# Altium PCB PCB_GEMAS_V2(RevisaEsta).PcbDoc
Units mm, origin at the board's own origin, x right, y up, seen from the top; angles counter-clockwise.
Board outline 100 x 72 mm, 2 copper layers (Top Layer, Bottom Layer); 89 components, 61 nets, 762 pads, 121 vias.
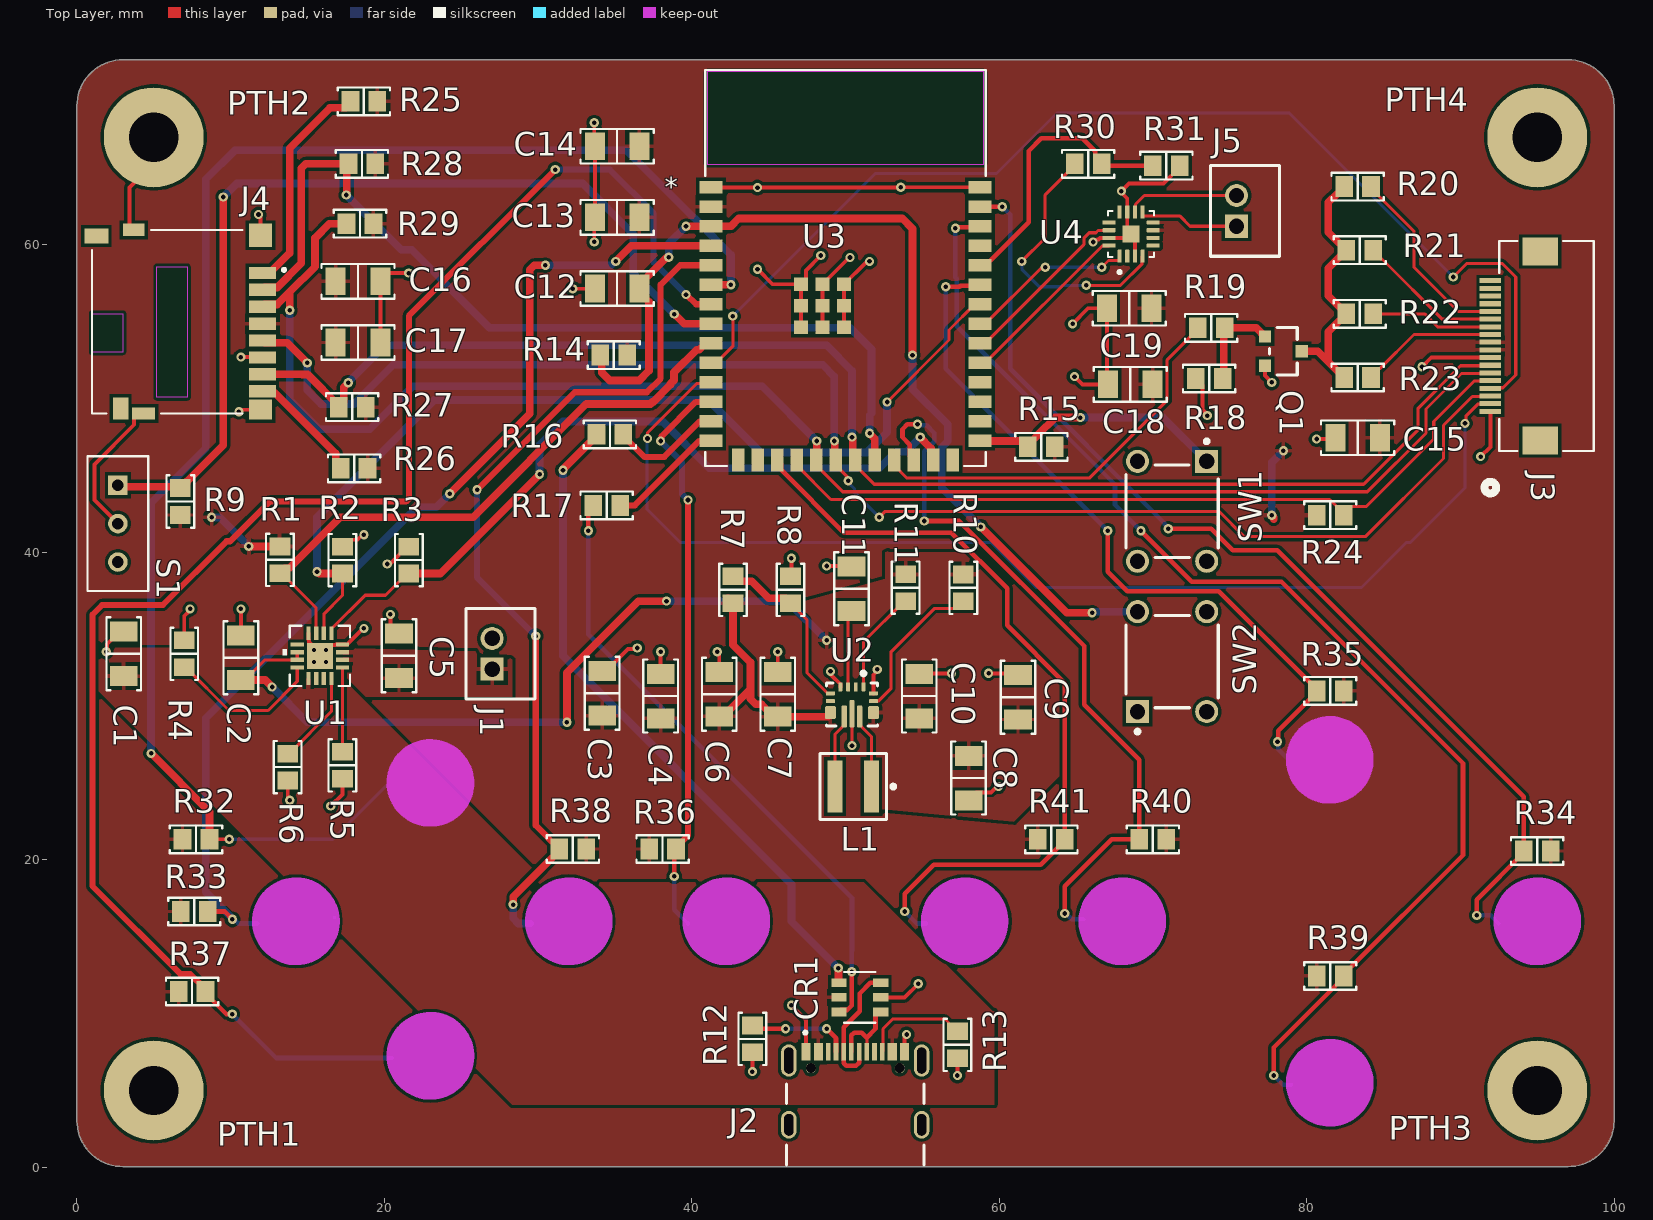
[diagram p0: Top Layer view]
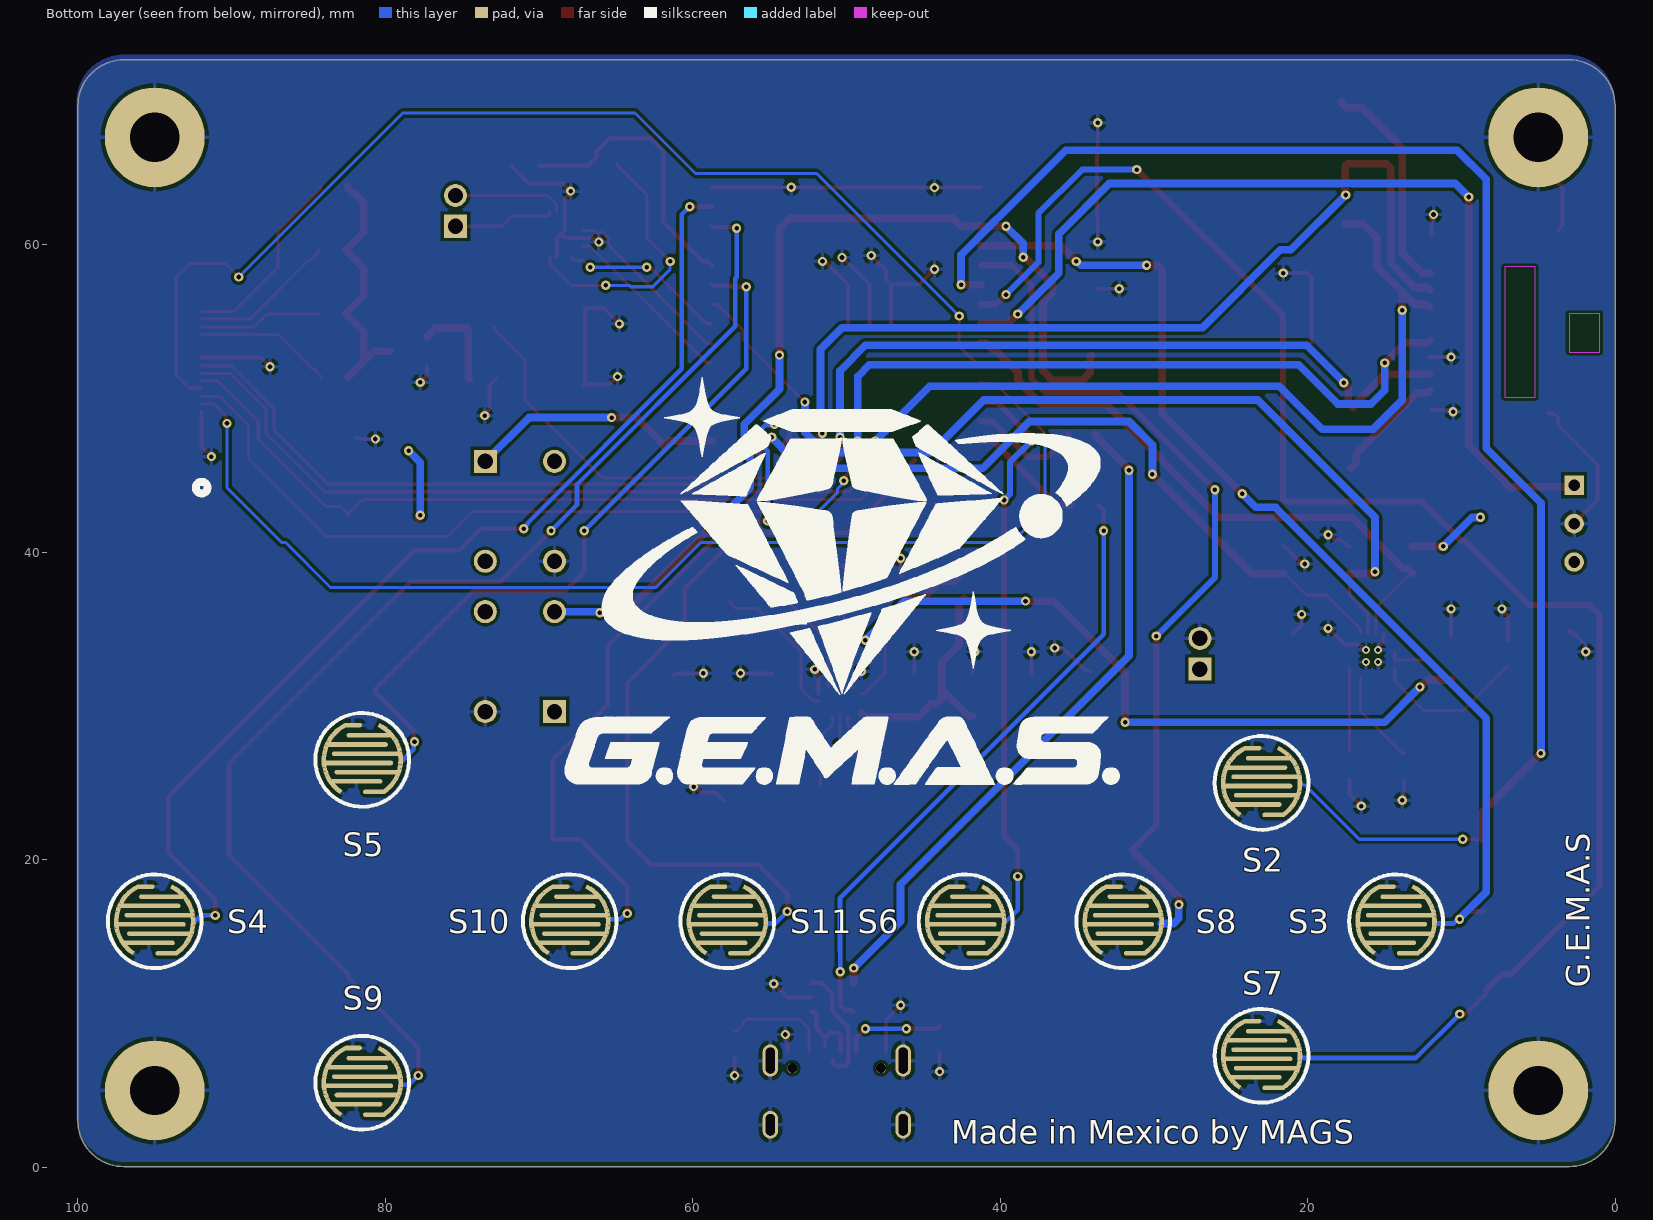
[diagram p1: Bottom Layer view, seen from below]
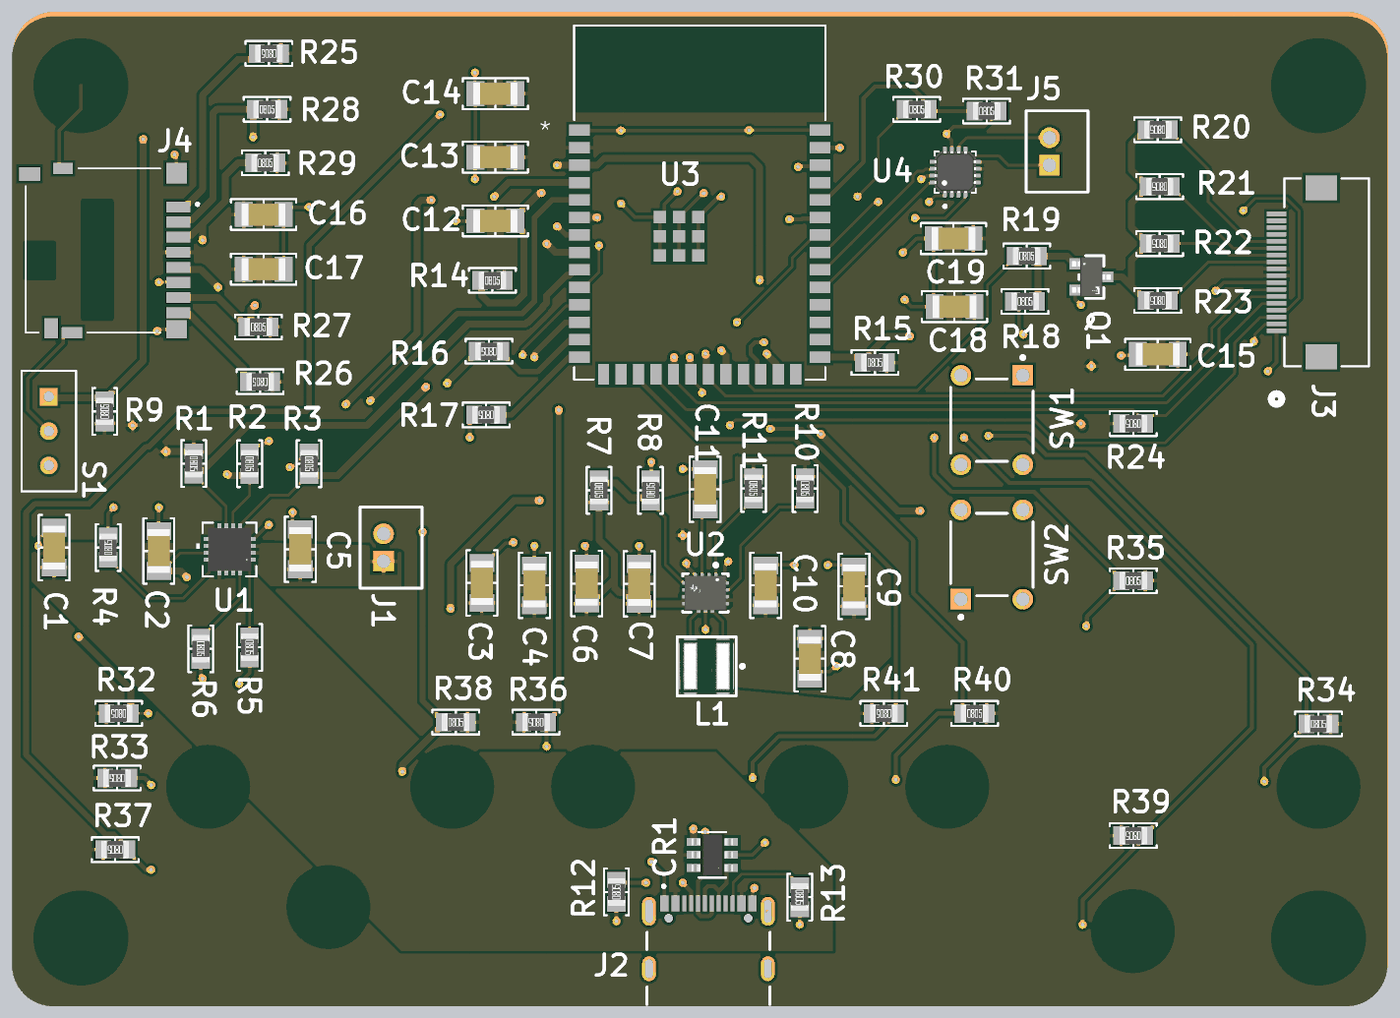
[diagram p2: 3D render of the assembled board from above, using the file's embedded part models]

## Layer stack, top to bottom
Top Solder: solder mask 0.0102, Solder Resist, Dk 3.5
Top Layer: signal copper 0.0356
Dielectric 1: dielectric 0.32, FR-4, Dk 4.8
Bottom Layer: signal copper 0.0356
Bottom Solder: solder mask 0.0102, Solder Resist, Dk 3.5

## Board outline
0,3.041 0,69.041 cw(c3,69.041) 3,72.041 97,72.041 cw(c97,69.041) 100,69.041 100,3.041 cw(c97,3.041) 97,0.041 3,0.041 cw(c3,3.041)

## Design rules (kind name [scope] priority, off if disabled: settings)
Clearance CLEARANCE_U1_VBAT_ESCAPE_LOCAL [IsTrack And InNet('VBAT') And InRegionRelative(670,1290,707,1335) vs IsPad And InComponent('U1')] p1: gap=0.2 ignorepadtopadclearanceinfootprint=FALSE
Clearance CLEARANCE_J4_PAD8_S1 [HasPad('J4-8') vs HasPad('J4-S1')] p2: gap=0.14 ignorepadtopadclearanceinfootprint=FALSE
Clearance CLEARANCE_J4_MECHANICAL [HasPad('J4-S3') vs HasPad('J4-SW-B')] p3: gap=0.24 ignorepadtopadclearanceinfootprint=FALSE
Clearance CLEARANCE_J2_NPTH_TO_SMD [IsPad And InComponent('J2') And (Hole = 0.65) vs IsPad And InComponent('J2') And (Hole = 0)] p4: gap=0.17 ignorepadtopadclearanceinfootprint=FALSE
Clearance Clearance_1CLEARANCE_J4_SIGNAL_PADS [HasPad('J4-1') Or HasPad('J4-2') Or HasPad('J4-3') Or HasPad('J4-4') Or HasPad('J4-5') Or HasPad('J4-6') Or HasPad('J4-7') Or HasPad('J4-8') vs HasPad('J4-1') Or HasPad('J4-2') Or HasPad('J4-3') Or HasPad('J4-4') Or HasPad('J4-5') Or HasPad('J4-6') Or HasPad('J4-7') Or HasPad('J4-8')] p5: gap=0.29 ignorepadtopadclearanceinfootprint=FALSE
Clearance CLEARANCE_U2_PADPAD [IsPad And InComponent('U2') vs IsPad And InComponent('U2')] p6: gap=0.15 ignorepadtopadclearanceinfootprint=FALSE
Clearance CLEARANCE_J2_SMD [IsPad And InComponent('J2') And (Hole = 0) vs IsPad And InComponent('J2') And (Hole = 0)] p7: gap=0.19 ignorepadtopadclearanceinfootprint=FALSE
Clearance CLEARANCE_CR1_PADPAD [IsPad And InComponent('CR1') vs IsPad And InComponent('CR1')] p8: gap=0.39 ignorepadtopadclearanceinfootprint=FALSE
Clearance CLEARANCE_J3_PADPAD [IsPad And InComponent('J3') vs IsPad And InComponent('J3')] p9: gap=0.16 ignorepadtopadclearanceinfootprint=FALSE
Clearance CLEARANCE_U4_PADPAD [IsPad And InComponent('U4') vs IsPad And InComponent('U4')] p10: gap=0.2 ignorepadtopadclearanceinfootprint=FALSE
Clearance CLEARANCE_U1_PADPAD [IsPad And InComponent('U1') vs IsPad And InComponent('U1')] p11: gap=0.19 ignorepadtopadclearanceinfootprint=FALSE
Clearance CLEARANCE_BUTTON_S2_PADPAD [IsPad And InComponent('S2') vs IsPad And InComponent('S2')] p12: gap=0.29 ignorepadtopadclearanceinfootprint=FALSE
Clearance CLEARANCE_BUTTON_S3_PADPAD [IsPad And InComponent('S3') vs IsPad And InComponent('S3')] p13: gap=0.29 ignorepadtopadclearanceinfootprint=FALSE
Clearance CLEARANCE_BUTTON_S4_PADPAD [IsPad And InComponent('S4') vs IsPad And InComponent('S4')] p14: gap=0.29 ignorepadtopadclearanceinfootprint=FALSE
Clearance CLEARANCE_BUTTON_S5_PADPAD [IsPad And InComponent('S5') vs IsPad And InComponent('S5')] p15: gap=0.29 ignorepadtopadclearanceinfootprint=FALSE
Clearance CLEARANCE_BUTTON_S6_PADPAD [IsPad And InComponent('S6') vs IsPad And InComponent('S6')] p16: gap=0.29 ignorepadtopadclearanceinfootprint=FALSE
Clearance CLEARANCE_BUTTON_S7_PADPAD [IsPad And InComponent('S7') vs IsPad And InComponent('S7')] p17: gap=0.29 ignorepadtopadclearanceinfootprint=FALSE
Clearance CLEARANCE_BUTTON_S8_PADPAD [IsPad And InComponent('S8') vs IsPad And InComponent('S8')] p18: gap=0.29 ignorepadtopadclearanceinfootprint=FALSE
Clearance CLEARANCE_BUTTON_S9_PADPAD [IsPad And InComponent('S9') vs IsPad And InComponent('S9')] p19: gap=0.29 ignorepadtopadclearanceinfootprint=FALSE
Clearance CLEARANCE_BUTTON_S10_PADPAD [IsPad And InComponent('S10') vs IsPad And InComponent('S10')] p20: gap=0.29 ignorepadtopadclearanceinfootprint=FALSE
Clearance CLEARANCE_BUTTON_S11_PADPAD [IsPad And InComponent('S11') vs IsPad And InComponent('S11')] p21: gap=0.29 ignorepadtopadclearanceinfootprint=FALSE
Clearance [All] p22: gap=0.2 ignorepadtopadclearanceinfootprint=FALSE
HoleSize HOLE_SIZE_M3_MOUNTING [HasPad('PTH1-1') Or HasPad('PTH2-1') Or HasPad('PTH3-1') Or HasPad('PTH4-1')] p1: absolutevalues=TRUE maxlimit=3.3 minlimit=0.025 maxpercent=80.000 minpercent=20.000
HoleSize [All] p2: absolutevalues=TRUE maxlimit=2.54 minlimit=0.025 maxpercent=80.000 minpercent=20.000
MinimumSolderMaskSliver [All] p1: minsoldermaskwidth=0.1
PolygonConnect [All] p1: connectstyle=Relief reliefconductorwidth=0.254 reliefentries=4 polygonreliefangle="90 Angle" airgapwidth=0.254
RoutingVias [All] p1: holewidth=0.3 width=0.6 viastyle="Through Hole" minholewidth=0.3 minwidth=0.6 maxholewidth=0.3 maxwidth=0.6
SilkToSolderMaskClearance [IsPad] p1: minsilkscreentomaskgap=0.15 clearancetoexposedcopper=TRUE
SolderMaskExpansion MASK_EXPANSION_BUTTON_S2 [IsPad And InComponent('S2')] p1: expansion=0.05 istentingtop=FALSE
SolderMaskExpansion MASK_EXPANSION_J4_LOCAL [HasPad('J4-8') Or HasPad('J4-S1')] p2: expansion=0.02 istentingtop=FALSE
SolderMaskExpansion MASK_EXPANSION_J2 [IsPad And InComponent('J2') And ((Hole = 0) Or (Hole = 0.65))] p3: expansion=0.03 istentingtop=FALSE
SolderMaskExpansion [All] p4: expansion=0.05 istentingtop=FALSE
SupplyNets "Schematic Supply Nets_4" [InNet('+3V3')] p1: voltage=0.000
SupplyNets "Schematic Supply Nets_3" [InNet('GND')] p2: voltage=0.000
SupplyNets "Schematic Supply Nets_2" [InNet('VBAT')] p3: voltage=0.000
SupplyNets "Schematic Supply Nets_1" [InNet('VSYS')] p4: voltage=0.000
SupplyNets "Schematic Supply Nets" [InNet('VBUS_V5')] p5: voltage=0.000
Width W_U1_VBAT_ESCAPE_LOCAL [IsTrack And InNet('VBAT') And InRegionRelative(670,1290,707,1335)] p1: maxlimit=1.5 minlimit=0.2 preferedwidth=0.4
Width W_BACKLIGHT [InNetClass('BACKLIGHT')] p2: maxlimit=0.5 minlimit=0.2 preferedwidth=0.5
Width W_SPEAKER [InNetClass('SPEAKER')] p3: maxlimit=0.8 minlimit=0.2 preferedwidth=0.5
Width W_POWER [InNetClass('POWER') Or InNetClass('REG_SW')] p4: maxlimit=1.5 minlimit=0.2 preferedwidth=0.8
Width [All] p5: maxlimit=1.5 minlimit=0.2 preferedwidth=0.4
27 further rules are at their usual default settings.

## Classes and differential pairs
net class CONTROL: NetC12_2 NetJ3_2 NetJ3_4 NetJ4_1 NetJ4_8 NetQ1_1 NetR2_2 NetR3_2 NetR9_2 NetR10_2 NetR11_2 NetR15_1 NetR19_1 NetR30_1 NetR30_2 NetR32_1 NetR33_1 NetR34_1 NetR35_1 NetR36_1 NetR37_1 NetR38_1 NetR39_1 NetR40_1 NetR41_1 USB_POWER_GOOD_N
net class POWER_ANALOG: NetC11_2 NetR4_1 NetR5_1 NetR6_1 NetR7_1
net class I2S: NetU3_31 NetU3_32 NetU3_33
net class SPI: NetJ3_5 NetJ4_2 SPI_MISO SPI_MOSI SPI_SCK
net class USB_CC: NetJ2_A5 NetJ2_B5
net class USB_DATA: NetCR1_1 NetCR1_3 NetCR1_4 NetCR1_6 NetR16_1 NetR17_1
net class BACKLIGHT: NetJ3_11 NetJ3_12 NetJ3_13 NetJ3_14 NetQ1_3
net class SPEAKER: NetJ5_1 NetJ5_2
net class REG_SW: NetL1_1 NetL1_2
net class GND: GND
net class POWER: +3V3 VBAT VBUS_V5 VSYS
component class USB-C: CR1 J2 R12 R13
component class Pantalla_microSD: C15 C16 C17 J3 J4 Q1 R18 R19 R20 R21 R22 R23 R24 R25 R26 R27 R28 R29
component class ESP32: C12 C13 C14 R14 R15 R16 R17 SW1 SW2 U3
component class Controles: PTH1 PTH2 PTH3 PTH4 R32 R33 R34 R35 R36 R37 R38 R39 R40 R41 S2 S3 S4 S5 S6 S7 S8 S9 S10 S11
component class Audio: C18 C19 J5 R30 R31 U4
component class Alimentacion: C1 C2 C3 C4 C5 C6 C7 C8 C9 C10 C11 J1 L1 R1 R2 R3 R4 R5 R6 R7 R8 R9 R10 R11 S1 U1 U2

## Components (designator, comment, footprint, x,y, rotation, side; value= is the part's Value field where it differs from the comment)
C1 "Capacitor" "CAP 1206_3216" 3.048,33.401 r90 top value=1uF
C2 "Capacitor" "CAP 1206_3216" 10.668,33.147 r270 top value=10uF
C3 "22uF" "CAP 1206_3216" 34.168,30.832 r90 top
C4 "22uF" "CAP 1206_3216" 37.977,30.652 r90 top
C5 "Capacitor" "CAP 1206_3216" 20.955,33.274 r270 top value=10uF
C6 "22uF" "CAP 1206_3216" 41.786,30.779 r90 top
C7 "Capacitor" "CAP 1206_3216" 45.595,30.762 r90 top value=10uF
C8 "Capacitor" "CAP 1206_3216" 58.007,25.318 r90 top value=10uF
C9 "Capacitor" "CAP 1206_3216" 61.219,30.578 r270 top value=10uF
C10 "Capacitor" "CAP 1206_3216" 54.794,30.652 r270 top value=10uF
C11 "Capacitor" "CAP 1206_3216" 50.395,37.638 r270 top value=100nF
C12 "1 uF" "CAP 1206_3216" 35.141,57.164 r0 top
C13 "Capacitor" "CAP 1206_3216" 35.141,61.792 r0 top value=22uF
C14 "Capacitor" "CAP 1206_3216" 35.141,66.421 r180 top value=100nF
C15 "Capacitor" "CAP 1206_3216" 83.312,47.459 r0 top value=100nF
C16 "Capacitor" "CAP 1206_3216" 18.288,57.629 r180 top value=100nF
C17 "Capacitor" "CAP 1206_3216" 18.288,53.65 r180 top value=10uF
C18 "Capacitor" "CAP 1206_3216" 68.527,50.927 r0 top value=10uF
C19 "Capacitor" "CAP 1206_3216" 68.453,55.88 r0 top value=100nF
CR1 "USBLC6-2SC6" SOT23-6L_STM 50.927,11.049 r180 top
J1 "B2B-PH-K-S(LF)(SN)" JST-B2B-PH-K-S_V 27.559,33.401 r90 top
J2 "USB4105-GF-A" GCT_USB4105-GF-A 50.635,2.762 r0 top
J3 "FH12-18S-0.5SH(55)" CONN_FH12-18S-0.5SH-55_HIR 91.948,49.173 r90 top
J4 "DM3D-SF" HRS_DM3D-SF 12.07,54.979 r90 top
J5 "B2B-PH-K-S(LF)(SN)" JST-B2B-PH-K-S_V 75.988,62.214 r90 top
L1 "1.5uH" FP-XFL4020-MFG 50.504,24.765 r180 top
PTH1 "MH_M3" PCBComponent_1#1 -53.217,211.535 r0 top
PTH2 "MH_M3" PCBComponent_1#2 54.61,212.344 r0 top
PTH3 "MH_M3" PCBComponent_1#3 46.736,212.344 r0 top
PTH4 "MH_M3" PCBComponent_1#4 28.571,279.48 r0 top
Q1 "AO3400A" FP-SOT23-MFG 78.486,53.086 r0 top
R1 "Resistor" "RES 0805_2012" 13.208,39.511 r270 top value="10 k"
R2 "Resistor" "RES 0805_2012" 17.272,39.497 r270 top value="10 k"
R3 "Resistor" "RES 0805_2012" 21.59,39.497 r270 top value="10 k"
R4 "Resistor" "RES 0805_2012" 6.985,33.401 r90 top value="3.48 k"
R5 "Resistor" "RES 0805_2012" 17.272,26.148 r270 top value="10 k"
R6 "Resistor" "RES 0805_2012" 13.716,26.035 r270 top value="1.78 k"
R7 "Resistor" "RES 0805_2012" 42.677,37.563 r270 top value="470 k"
R8 "Resistor" "RES 0805_2012" 46.423,37.563 r90 top value="150 k"
R9 "Resistor" "RES 0805_2012" 6.731,43.307 r90 top value=10k
R10 "Resistor" "RES 0805_2012" 57.663,37.69 r270 top value=10k
R11 "Resistor" "RES 0805_2012" 53.917,37.704 r270 top value=10k
R12 "Resistor" "RES 0805_2012" 43.942,8.349 r90 top value="5.1 k"
R13 "Resistor" "RES 0805_2012" 57.277,7.968 r270 top value="5.1 k"
R14 "10 k" "RES 0805_2012" 34.925,52.832 r0 top value="10 K"
R15 "10 k" "RES 0805_2012" 62.738,46.863 r0 top value="10 K"
R16 "Resistor" "RES 0805_2012" 34.677,47.682 r180 top value=22
R17 "Resistor" "RES 0805_2012" 34.466,43.053 r180 top value=22
R18 "Resistor" "RES 0805_2012" 73.66,51.308 r0 top value="100 k"
R19 "Resistor" "RES 0805_2012" 73.787,54.61 r0 top value=100
R20 "Resistor" "RES 0805_2012" 83.312,63.795 r180 top value="1 k"
R21 "Resistor" "RES 0805_2012" 83.453,59.655 r180 top value="1 k"
R22 "Resistor" "RES 0805_2012" 83.453,55.514 r180 top value="1 k"
R23 "Resistor" "RES 0805_2012" 83.312,51.374 r180 top value="1 k"
R24 "Resistor" "RES 0805_2012" 81.534,42.418 r180 top value="10 k"
R25 "Resistor" "RES 0805_2012" 18.669,69.342 r180 top value="10 k"
R26 "Resistor" "RES 0805_2012" 18.034,45.466 r180 top value="10 k"
R27 "Resistor" "RES 0805_2012" 17.907,49.445 r0 top value="10 k"
R28 "Resistor" "RES 0805_2012" 18.542,65.278 r0 top value="10 k"
R29 "Resistor" "RES 0805_2012" 18.415,61.383 r0 top value="10 k"
R30 "Resistor" "RES 0805_2012" 65.786,65.278 r0 top value="634 K"
R31 "Resistor" "RES 0805_2012" 70.866,65.151 r0 top value=10k
R32 "Resistor" "RES 0805_2012" 7.747,21.336 r180 top value="10 k"
R33 "Resistor" "RES 0805_2012" 7.634,16.637 r180 top value="10 k"
R34 "Resistor" "RES 0805_2012" 94.996,20.574 r0 top value="10 k"
R35 "Resistor" "RES 0805_2012" 81.534,30.988 r0 top value="10 k"
R36 "Resistor" "RES 0805_2012" 38.1,20.701 r180 top value="10 k"
R37 "Resistor" "RES 0805_2012" 7.493,11.43 r180 top value="10 k"
R38 "Resistor" "RES 0805_2012" 32.258,20.701 r0 top value="10 k"
R39 "Resistor" "RES 0805_2012" 81.534,12.446 r180 top value="10 k"
R40 "Resistor" "RES 0805_2012" 69.991,21.336 r0 top value="10 k"
R41 "Resistor" "RES 0805_2012" 63.387,21.336 r180 top value="10 k"
S1 "Single-Pole, Double-Throw Switch" 1P2T_SS-12D00_CNK 2.667,44.37 r0 top
S2 "Single-Pole, Single-Throw Switch" SNES_BTN_soft+mech_5mm_0.3_0.3 23,25 r180 bottom
S3 "Single-Pole, Single-Throw Switch" SNES_BTN_soft+mech_5mm_0.3_0.3 14.25,16 r180 bottom
S4 "Single-Pole, Single-Throw Switch" SNES_BTN_soft+mech_5mm_0.3_0.3 95,16 r180 bottom
S5 "Single-Pole, Single-Throw Switch" SNES_BTN_soft+mech_5mm_0.3_0.3 81.5,26.5 r180 bottom
S6 "Single-Pole, Single-Throw Switch" SNES_BTN_soft+mech_5mm_0.3_0.3 42.25,16 r180 bottom
S7 "Single-Pole, Single-Throw Switch" SNES_BTN_soft+mech_5mm_0.3_0.3 23,7.25 r180 bottom
S8 "Single-Pole, Single-Throw Switch" SNES_BTN_soft+mech_5mm_0.3_0.3 32,16 r180 bottom
S9 "Single-Pole, Single-Throw Switch" SNES_BTN_soft+mech_5mm_0.3_0.3 81.5,5.5 r180 bottom
S10 "Single-Pole, Single-Throw Switch" SNES_BTN_soft+mech_5mm_0.3_0.3 68,16 r180 bottom
S11 "Single-Pole, Single-Throw Switch" SNES_BTN_soft+mech_5mm_0.3_0.3 57.75,16 r180 bottom
SW1 "B3F-1000" OMRON-B3F-1000-4_V 71.247,42.672 r270 top
SW2 "B3F-1000" OMRON-B3F-1000-4_V 71.247,32.893 r90 top
U1 "BQ24074RGTR" RGT16_1P7X1P7 15.812,33.261 r180 top
U2 "TPS63070RNMR" FP-RNM0015A-MFG 50.419,30.099 r270 top
U3 "ESP32-S3-WROOM-1-N16R8" ESP32-S3-WROOM-1_EXP 50,58.5 r0 top
U4 "MAX98357AETE+T" QFN50P300X300X80-17N 68.58,60.706 r90 top

## Footprints (in the part's own frame and the unit in brackets; to place one, negate y for a bottom-side part, rotate by r counter-clockwise, add the part's x,y. Pads: shape width x height; smd on the part's side, far side on the other; paste and mask are expansions set on the pad)
1P2T_SS-12D00_CNK [mil]
  rect 50x50 hole 30 paste-99999 mask+0: 1(0,0)
  round 50 hole 30 paste-99999 mask+0: 2(0,-98.42) 3(0,-196.85)
  silkscreen extent -78,-271 78,74
"CAP 1206_3216" [mm] "Chip Capacitor, 2-Leads, Body 3.25x1.60mm, IPC Medium Density"
  rect 1.3x1.8 smd: 1(-1.45,0) 2(1.45,0)
  silkscreen extent -2.38,-1.13 2.38,1.13, body extent -1.6,-0.81 1.6,0.81, height 1.62
CONN_FH12-18S-0.5SH-55_HIR [mil]
  rect 13x55 smd paste+0 mask+0: 1(0,0) 2(19.68,0) 3(39.37,0) 4(59.05,0) 5(78.74,0) 6(98.42,0) 7(118.11,0) 8(137.79,0) 9(157.48,0) 10(177.17,0) 11(196.85,0) 12(216.54,0) 13(236.22,0) 14(255.91,0) 15(275.59,0) 16(295.28,0) 17(314.96,0) 18(334.65,0)
  rect 71x91 smd paste+0 mask+0: 19(-74.8,-127.95) 20(409.45,-127.95)
  silkscreen extent -210,-264 436,15
ESP32-S3-WROOM-1_EXP [mil]
  rect 59x32 smd paste+0 mask+0: 1(-344.49,207.09) 2(-344.49,157.09) 3(-344.49,107.09) 4(-344.49,57.09) 5(-344.49,7.09) 6(-344.49,-42.91) 7(-344.49,-92.91) 8(-344.49,-142.91) 9(-344.49,-192.91) 10(-344.49,-242.91) 11(-344.49,-292.91) 12(-344.49,-342.91) 13(-344.49,-392.91) 14(-344.49,-442.91) 27(344.49,-442.91) 28(344.49,-392.91) 29(344.49,-342.91) 30(344.49,-292.91) 31(344.49,-242.91) 32(344.49,-192.91) 33(344.49,-142.91) 34(344.49,-92.91) 35(344.49,-42.91) 36(344.49,7.09) 37(344.49,57.09) 38(344.49,107.09) 39(344.49,157.09) 40(344.49,207.09)
  rect 32x59 smd paste+0 mask+0: 15(-275,-492.13) 16(-225,-492.13) 17(-175,-492.13) 18(-125,-492.13) 19(-75,-492.13) 20(-25,-492.13) 21(25,-492.13) 22(75,-492.13) 23(125,-492.13) 24(175,-492.13) 25(225,-492.13) 26(275,-492.13)
  rect 35x35 smd paste+0 mask+0: 41(-59.06,-96.85) 42(-114.17,-41.73) 43(-114.17,-96.85) 44(-114.17,-151.97) 45(-59.06,-151.97) 46(-3.94,-151.97) 47(-3.94,-96.85) 48(-3.94,-41.73) 49(-59.06,-41.73)
  Top Layer keep-out region: 354.5,502 -354.5,502 -354.5,266 354.5,266
  silkscreen extent -359,-507 360,507
FP-RNM0015A-MFG [mm]
  rrect40% 0.6x0.25 smd paste+0 mask-1000: 1(-1.15,0.75) 2(-1.15,0.25) 3(-1.15,-0.25) 4(-1.15,-0.75)
  rrect40% 0.25x0.6 smd paste+0 mask-1000: 5(-0.725,-1.4) 6(-0.225,-1.4) 14(-0.225,1.4) 15(-0.725,1.4)
  rrect29% 0.85x0.7 smd paste-1000 mask-1000: 7-8(0.525,-1.4) 12-13(0.525,1.4)
  rrect57% 1.45x0.35 smd paste-1000 mask-1000: 9(0.775,-0.5) 11(0.775,0.5)
  rrect57% 1.8x0.35 smd paste-1000 mask-1000: 10(0.6,0)
  silkscreen extent -2.15,-1.65 1.4,1.65, body extent -1.25,-1.5 1.25,1.5, height 1
FP-SOT23-MFG [mm]
  rect 0.8x0.8 smd paste+0 mask+0: 1(-1.2,0.95) 2(-1.2,-0.95) 3(1.2,0)
  silkscreen extent -0.9,-1.55 0.9,1.55, body extent -1.41,-1.45 1.41,1.45, height 1.25
FP-XFL4020-MFG [mm]
  rect 0.98x3.4 smd paste+0 mask+0: 1(-1.185,0) 2(1.185,0)
  silkscreen extent -2.73,-2.15 2.15,2.15, body extent -2,-2 2,2, height 2.23
GCT_USB4105-GF-A [mm]
  rect 0.6x1.15 smd: A1_B12(-3.2,4.755) A4_B9(-2.4,4.755) B1_A12(3.2,4.755) B4_A9(2.4,4.755)
  rect 0.3x1.15 smd: A5(-1.25,4.755) A6(-0.25,4.755) A7(0.25,4.755) A8(1.25,4.755) B5(1.75,4.755) B6(0.75,4.755) B7(-0.75,4.755) B8(-1.75,4.755)
  oval 1x2.1 hole 0.6 slot 1.7 at 90 deg: SH1(-4.32,4.18) SH2(4.32,4.18)
  oval 1x1.8 hole 0.6 slot 1.4 at 90 deg: SH3(-4.32,0) SH4(4.32,0)
  round 0.65 hole 0.65 unplated: ""(-2.89,3.68) ""(2.89,3.68)
  silkscreen extent -4.47,-2.6 4.47,6.1
HRS_DM3D-SF [mm]
  rect 0.8x1.75 smd: 1(3.2,0) 2(2.1,0) 3(1,0) 4(-0.1,0) 5(-1.2,0) 6(-2.3,0) 7(-3.4,0) 8(-4.5,0)
  rect 1.3x1.5 smd: S1(-5.7,0.125)
  rect 1.5x1.5 smd: S2(5.65,0.125)
  rect 0.8x1.5 smd: S3(-5.95,7.725)
  rect 0.8x1.4 smd: S4(6,8.375)
  rect 1x1.55 smd: SW-A(5.6,10.8)
  rect 1.45x1 smd: SW-B(-5.625,9.225)
  Keep-Out Layer region: 0.55,9.075 -1.95,9.075 -1.95,11.075 0.55,11.075
  Keep-Out Layer region: 3.6,4.875 -4.9,4.875 -4.9,6.875 3.6,6.875
  Keep-Out Layer region: 3.6,4.875 -4.9,4.875 -4.9,6.875 3.6,6.875
  Keep-Out Layer region: 0.55,9.075 -1.95,9.075 -1.95,11.075 0.55,11.075
  silkscreen extent -5.95,-1.5 6,11.08
JST-B2B-PH-K-S_V [mm] "Connector, 2-Leads, Body 5.9x4.5mm, Pitch 2mm"
  rect 1.5x1.5 hole 1: 1(-1,0.55)
  round 1.5 hole 1: 2(1,0.55)
  silkscreen extent -2.95,-2.25 2.95,2.25, body extent -2.95,-2.25 2.95,2.25, height 6
OMRON-B3F-1000-4_V [mm] "TH, 4-Leads, Body 6x6mm"
  rect 1.5x1.5 hole 1 paste-2539.97: 1(-3.25,2.25)
  round 1.5 hole 1 paste-2539.97: 2(3.25,2.25) 4(3.25,-2.25)
  round 1.5 hole 1 paste-2539.97 mask+0.102: 3(-3.25,-2.25)
  silkscreen extent -4.67,-3 3,3, body extent -3,-3 3,3, height 4.5
PCBComponent_1#1 [mm]
  round 6.5 hole 3.2: 1(58.217,-206.535)
PCBComponent_1#2 [mm]
  round 6.5 hole 3.2: 1(-49.61,-145.344)
PCBComponent_1#3 [mm]
  round 6.5 hole 3.2: 1(48.264,-207.344)
PCBComponent_1#4 [mm]
  round 6.5 hole 3.2: 1(66.429,-212.48)
QFN50P300X300X80-17N [mm]
  rrect25% 0.84x0.27 smd: 1(-1.435,0.75) 2(-1.435,0.25) 3(-1.435,-0.25) 4(-1.435,-0.75) 9(1.435,-0.75) 10(1.435,-0.25) 11(1.435,0.25) 12(1.435,0.75)
  rrect25% 0.27x0.84 smd: 5(-0.75,-1.435) 6(-0.25,-1.435) 7(0.25,-1.435) 8(0.75,-1.435) 13(0.75,1.435) 14(0.25,1.435) 15(-0.25,1.435) 16(-0.75,1.435)
  rect 1.1x1.1 smd paste-0.2: 17(0,0)
  silkscreen extent -2.57,-1.5 1.5,1.5, body extent -1.5,-1.5 1.5,1.5, height 0.9
"RES 0805_2012" [mm] "Chip Resistor, 2-Leads, Body 2.00x1.25mm, IPC Medium Density"
  rect 1.15x1.35 smd: 1(-0.875,0) 2(0.875,0)
  silkscreen extent -1.7,-0.9 1.7,0.9, body extent -1,-0.62 1,0.63, height 0.6
RGT16_1P7X1P7 [mm]
  rect 0.85x0.28 smd paste+0 mask+0: 1(-1.475,0.75) 2(-1.475,0.25) 3(-1.475,-0.25) 4(-1.475,-0.75) 9(1.475,-0.75) 10(1.475,-0.25) 11(1.475,0.25) 12(1.475,0.75)
  rect 0.28x0.85 smd paste+0 mask+0: 5(-0.75,-1.475) 6(-0.25,-1.475) 7(0.25,-1.475) 8(0.75,-1.475) 13(0.75,1.475) 14(0.25,1.475) 15(-0.25,1.475) 16(-0.75,1.475)
  rect 1.7x1.7 smd paste-0.85 mask-0.838: 17(0,0)
  round 0.508 hole 0.254 paste-2539.97 mask-0.254: V(-0.394,0.394) V(-0.394,-0.394) V(0.394,0.394) V(0.394,-0.394)
  silkscreen extent -1.96,-1.96 2.41,1.96, body extent -1.63,-1.63 1.63,1.63, height 1
SNES_BTN_soft+mech_5mm_0.3_0.3 [mm]
  rect 0.3x0.3 smd rot 1.24: 1(-2.499,-0.054)
  rect 0.3x0.3 smd rot 174.75: 1(-2.49,0.229)
  rect 0.3x0.3 smd rot 7.73: 1(-2.477,-0.336)
  rect 0.3x0.3 smd rot 168.27: 1(-2.448,0.508)
  rect 0.3x0.3 smd rot 14.21: 1(-2.423,-0.614)
  rect 0.3x0.3 smd rot 161.78: 1(-2.375,0.782)
  rect 0.3x0.3 smd rot 20.7: 1(-2.339,-0.884)
  rect 0.3x0.3 smd rot 155.29: 1(-2.271,1.045)
  rect 0.3x0.3 smd rot 27.18: 1(-2.224,-1.142)
  rect 0.3x0.3 smd rot 148.81: 1(-2.139,1.295)
  rect 0.3x0.3 smd rot 33.67: 1(-2.081,-1.386)
  rect 0.3x0.3 smd rot 142.32: 1(-1.979,1.528)
  rect 0.3x0.3 smd rot 40.16: 1(-1.911,-1.612)
  rect 0.3x0.3 smd rot 135.84: 1(-1.793,1.742)
  rect 0.3x0.3 smd rot 46.64: 1(-1.716,-1.818)
  rect 0.3x0.3 smd rot 129.35: 1(-1.585,1.933)
  rect 0.3x0.3 smd rot 53.13: 1(-1.5,-2)
  rect 0.3x0.3 smd rot 122.86: 1(-1.357,2.1)
  rect 0.3x0.3 smd rot 118.36: 1(-1.187,2.2)
  rrect100% 1.187x0.3 smd: 1(-0.61,2.26)
  rrect100% 3.377x0.3 smd: 1(-0.383,-1.4)
  rrect100% 3.968x0.3 smd: 1(-0.307,1)
  rrect100% 4.506x0.3 smd: 1(-0.239,-0.2)
  rrect100% 4.434x0.3 smd: 2(0.251,0.4)
  rrect100% 4.169x0.3 smd: 2(0.284,-0.8)
  rrect100% 2.938x0.3 smd: 2(0.452,1.6)
  rrect100% 1.5x0.3 smd: 2(0.8,-2.08)
  rect 0.3x0.3 smd rot 61.64: 2(1.187,2.2)
  rect 0.3x0.3 smd rot 55.16: 2(1.428,2.052)
  rect 0.3x0.3 smd rot 126.87: 2(1.5,-2)
  rect 0.3x0.3 smd rot 48.67: 2(1.651,1.877)
  rect 0.3x0.3 smd rot 131.38: 2(1.652,-1.876)
  rect 0.3x0.3 smd rot 42.18: 2(1.852,1.679)
  rect 0.3x0.3 smd rot 137.86: 2(1.854,-1.677)
  rect 0.3x0.3 smd rot 35.7: 2(2.03,1.459)
  rect 0.3x0.3 smd rot 144.35: 2(2.031,-1.457)
  rect 0.3x0.3 smd rot 29.21: 2(2.182,1.22)
  rect 0.3x0.3 smd rot 150.83: 2(2.183,-1.218)
  rect 0.3x0.3 smd rot 22.72: 2(2.306,0.966)
  rect 0.3x0.3 smd rot 157.32: 2(2.307,-0.964)
  rect 0.3x0.3 smd rot 16.24: 2(2.4,0.699)
  rect 0.3x0.3 smd rot 163.81: 2(2.401,-0.697)
  rect 0.3x0.3 smd rot 9.75: 2(2.464,0.423)
  rect 0.3x0.3 smd rot 170.29: 2(2.464,-0.422)
  rect 0.3x0.3 smd rot 3.27: 2(2.496,0.142)
  rect 0.3x0.3 smd rot 176.78: 2(2.496,-0.14)
  silkscreen extent -3.05,-3.05 3.05,3.05
SOT23-6L_STM [mil]
  rect 38.5x22 smd paste+0 mask+0: 1(-53.75,37.4) 2(-53.75,0) 3(-53.75,-37.4) 4(53.75,-37.4) 5(53.75,0) 6(53.75,37.4)
  silkscreen extent -40,-65 40,65, body extent -59,-60 59,60, height 57

## Part data
C3 C4 C6: library part Capacitor, "22F", SimulationGenericComponent=True
C12: library part Capacitor, "Capacitor", SimulationGenericComponent=True
CR1: "ESD Protection for USB 2.0 High Speed", Manufacturer_Name=STMicroelectronics, Copyright="Copyright (C) 2025 Ultra Librarian. All rights reserved.", Manufacturer_Part_Number=USBLC6-2SC6, RefDes=RefDes, Type=Type
J1 J5: library part CMP-2000-05162-1, "Male Header, Pitch 2 mm, 1 x 2 Position, Height 6 mm, Tail Length 3.4 mm, -25 to 85 degC, RoHS, Bulk", Manufacturer=JST, Datasheet URL=http://datasheet.octopart.com/B2B-PH-K-S%28LF%29%28SN%29-JST-datasheet-8324864.pdf, Datasheet Version=Nov-08, Manufacturer URL=http://www.jst.com/home2.html, No of Positions=2, Pitch=2mm, Style/Orientation=StraightHeader/Plug, Termination=Crimp, Type=ShroudedHeader
J2: Package=None, Availability=Unavailable, MF="{'manufacturer': u'GCT'}", MP=USB4105-GF-A, Price=None
J3: library part FH12-18S-0.5SH55, "Description", Manufacturer_Name=Hirose, Copyright="Copyright (C) 2026 Ultra Librarian. All rights reserved.", Manufacturer_Part_Number=FH12-18S-0.5SH(55), RefDes=RefDes, Type=Type
J4: "10 _8 + 2_ Position Card Connector Secure Digital - microSDâ„¢ Surface Mount, Right Angle Gold", Package=None, Availability=Unavailable, MF="Hirose Electric", MP=DM3D-SF, Price=None, SnapEDA_Link=https://www.snapeda.com/parts/DM3D-SF/Hirose%20Electric%20Co%20Ltd/view-part/250106/?ref=snap
L1: library part CMP-11268-000104-1, "Inductor Power Shielded Wirewound 1.5uH 20% 100KHz 9.1A 15.8mOhm DCR 1515 Automotive Embossed Plastic T/R", Case/Package=SMD/SMT, DC Resistance (DCR)=15.8mR, Inductance Tolerance=20%, Max DC Current=9.1A, Max Operating Temperature=125°C, Min Operating Temperature=-40°C, Saturation Current=4.1A, Self Resonant Frequency=59MHz, Test Frequency=100kHz, Core Material=Composite, Height=2.1mm, Inductance=1.5uH, Lead Free="Contains Lead", Length=4.3mm, Mount="Surface Mount", Packaging="Tape and Reel", REACH SVHC="No SVHC", RMS Current (Irms)=9.1A, RoHS Compliant=Yes, Series=XFL4020, Shielding=Shielded, Termination=SMD/SMT, Tolerance=20%, Width=4.3mm
Q1: library part CMP-83955-000006-1, "MOSFET N-CH 30V 5.7A SOT23", Case/Package=SOT-23, Continuous Drain Current (ID)=5.7A, Drain to Source Voltage (Vdss)=30V, Gate to Source Voltage (Vgs)=12V, Input Capacitance=630pF, Max Operating Temperature=150°C, Max Power Dissipation=1.4W, Min Operating Temperature=-55°C, Lead Free="Lead Free", Mount="Surface Mount", Number of Elements=1, Number of Pins=3, Packaging="Tape and Reel", Power Dissipation=1.4W, Radiation Hardening=No, Rds On Max=26.5mR
R14 R15: library part Resistor, "Resistor", SimulationGenericComponent=True, TC1=0, TC2=0
S1: library part "SPDT SW", nodeUP_closed=1, Rclosed=1m, Ropen=1Meg, SimulationGenericComponent=True
S2 S3 S4 S5 S6 S7 S8 S9 S10 S11: library part "SPST SW", closed=0, Rclosed=1m, Ropen=1Meg, SimulationGenericComponent=True
SW1 SW2: library part CMP-1677-00002-1, "Tactile Switch, SPST-NO, 0.05 A, 5 to 24 V, -25 to 70 degC, 4-Pin THD, RoHS, Bulk", Capacitance="-45 f", Current Rating="1.5 A", Max Operating Temperature="70 degC", Min Operating Temperature="-40 degC", Package Quantity=1080, Voltage Rating="150 V", ComponentLink1Description="Manufacturer URL", ComponentLink1URL=http://www.omron.com/, ComponentLink2Description=Datasheet, ComponentLink2URL=http://www.omron.com/ecb/products/pdf/en-b3f.pdf, Contact Material=Brass, Contact Plating=Gold, DatasheetVersion=Jan-15, Gender=Female, Height="14.99 mm", Lead Pitch="1.27 mm", Length="18.34 mm", Mount="Through Hole", PackageDescription="4-Pin Through Hole Device, Body 6 x 6 mm", PackageReference=B3F-1000, Packaging=Tray, Pins=8, Radiation Hardening=No, RoHSCompliant=true, Shielding=Shielded, Width="25.4 mm"
U1: "Standalone 1-cell 1.5-A linear battery charger, Power Path, 4.2-V VBAT, 10.5-V OVP and 4.4-V VOUT 16-VQFN -40 to 85", Manufacturer_Name="Texas Instruments", Copyright="Copyright (C) 2026 Ultra Librarian. All rights reserved.", Manufacturer_Part_Number=BQ24074RGTR, RefDes=RefDes, Type=Type
U2: library part CMP-04918-000409-1, "IC REG BCK BST ADJ 3.6A 15VQFN", Case/Package=VQFN, Max Input Voltage=16V, Max Operating Temperature=125°C, Max Output Voltage=9V, Min Input Voltage=2V, Min Operating Temperature=-40°C, Min Output Voltage=2.5V, Output Current=2A, Quiescent Current=50uA, Switching Frequency=2.4MHz, Lead Free="Lead Free", Mount="Surface Mount", Number of Outputs=1, Number of Pins=15, Output Configuration=Positive, Output Type=Adjustable, Packaging="Tape and Reel", RoHS Compliant=Yes, Synchronous Rectifier=Yes, Topology=Buck-Boost
U3: "Description", Manufacturer_Name="Espressif Systems", Copyright="Copyright (C) 2026 Ultra Librarian. All rights reserved.", Manufacturer_Part_Number=ESP32-S3-WROOM-1-N16R8, RefDes=RefDes, Type=Type
U4: "Tiny, Low-Cost, PCM Class D Amplifier with Class AB Performance", Package="TQFN-16 Maxim", Check_prices=https://www.snapeda.com/parts/MAX98357AETE+T/Analog+Devices/view-part/?ref=eda, MF="Analog Devices", MP=MAX98357AETE+T, SnapEDA_Link=https://www.snapeda.com/parts/MAX98357AETE+T/Analog+Devices/view-part/?ref=snap
C1 C2 C5 C7 C8 C9 C10 C11 C13 C14 C15 C16 C17 C18 C19: SimulationGenericComponent=True
R1 R2 R3 R4 R5 R6 R7 R8 R9 R10 R11 R12 R13 R16 R17 R18 R19 R20 R21 R22 R23 R24 R25 R26 R27 R28 R29 R30 R31 R32 R33 R34 R35 R36 R37 R38 R39 R40 R41: SimulationGenericComponent=True, TC1=0, TC2=0

## Via types
v1: diameter 0.6, hole 0.3, Top Layer to Bottom Layer, 121 vias

## Nets (pads, with @x,y where several pads share a name; then routed paths per layer and width w, separated by ;. In a path a pad name is that pad's centre, name@x,y a point inside that pad or via, vN(x,y) a via of type N, cw(c..) or ccw(c..) an arc to the next point about the centre after c; other vN are vias at no path point)
+3V3: C3.1 C4.1 C6.1 C7.1 C13.2 C14.1 C15.2 C16.2 C17.2 C18.2 C19.2 J3.9 J3.10 J4.4 R1.1 R7.2 R9.1 R14.2 R15.2 R24.2 R25.1 R26.1 R27.2 R28.2 R29.2 R32.2 R33.2 R34.2 R35.2 R36.2 R37.2 R38.2 R39.2 R40.2 R41.2 U2.7-8 U3.2 U4.7 U4.8 | length 25.9
  Top Layer w0.5: v1(11.176,40.386) R1.1 ; C6.1 42.036,29.329 43.815,31.108 43.815,31.242 ; R7.2@42.352,37.013 R7.2 42.677,33.99 43.815,32.853 43.815,31.242 ; U2.7-8 49.019,29.499 48.832,29.312 C7.1 45.345,29.312 44.531,30.126 44.169,30.126 43.815,30.48 43.815,31.242 ; v1(77.724,42.418) 77.724,42.391 77.851,42.264 v1@77.851,42.164
  Bottom Layer w0.5: v1(8.763,42.291) 8.782,42.272 9.29,42.272 v1(11.176,40.386) ; v1(77.724,42.418) 77.724,45.847 v1(78.486,46.609)
GND: C1.2 C2.1 C3.2 C4.2 C5.1 C6.2 C7.2 C8.1 C9.1 C10.1 C11.1 C12.1 C13.1 C14.2 C15.1 C16.1 C17.1 C18.1 C19.1 CR1.2 J1.2 J2.A1_B12 J2.B1_A12 J2.SH1 J2.SH2 J2.SH3 J2.SH4 J3.1 J3.8 J4.6 J4.S1 J4.S2 J4.S3 J4.S4 PTH1.1 PTH2.1 PTH3.1 PTH4.1 Q1.2 R2.1 R3.1 R4.2 R5.2 R6.2 R8.2 R12.1 R13.2 R18.1 R31.2 S1.2 S2.1 S3.1 S4.1 S5.1 S6.1 S7.1 S8.1 S9.1 S10.1 S11.1 SW1.4 SW2.3 U1.4 U1.8 U1.17 U1.V U2.4 U2.10 U2.15 U3.1 U3.40 U3.41 U3.42 U3.43 U3.44 U3.45 U3.46 U3.47 U3.48 U3.49 U4.3 U4.11 U4.15 U4.17 | length 157
  Top Layer w0.2: v1(50.419,27.432) U2.10
  Top Layer w0.254: v1(1.905,33.528) 1.971,33.594 1.971,34.024 2.798,34.851 C1.2 ; S1.2 1.143,43.394 1.143,45.72 3.722,48.299 3.722,48.756 3.995,49.029 J4.S3 ; J4.S4 3.429,61.245 3.429,63.739 5,65.31 PTH2.1 ; R4.2 6.985,35.847 7.366,36.228 v1(7.366,36.322) ; v1(10.541,49.149) 10.635,49.149 10.765,49.279 J4.S1 ; C2.1 v1(10.668,36.322) ; v1(10.668,52.705) 12.044,52.705 J4.6 ; v1(11.811,61.976) 11.811,61.882 11.945,61.748 J4.S2 ; R6.2 13.716,24.097 13.843,23.97 v1(13.843,23.876) ; U1.8 15.074,34.723 15.074,34.329 15.094,34.309 15.094,34.176 15.369,33.901 15.369,33.704 U1.V@15.418,33.655 ; U1.V@16.205,33.655 16.274,33.655 16.603,33.984 16.837,33.984 16.851,33.998 17.274,33.998 U1.4 17.572,34.011 18.612,35.052 v1(18.669,35.052) ; v1(16.51,23.495) 17.272,24.257 R5.2 ; R2.1 17.372,40.372 17.82,40.82 18.247,40.82 18.575,41.148 v1(18.669,41.148) ; C17.1 C16.1 19.738,57.879 20.025,58.166 v1(21.59,58.166) ; v1(20.193,39.243) 20.259,39.309 20.427,39.309 21.49,40.372 R3.1 ; v1(20.396,35.966) 20.396,35.247 20.919,34.724 C5.1 ; v1(32.258,57.15) 33.677,57.15 C12.1 ; v1(33.655,60.198) 33.655,61.756 C13.1 C14.2 33.655,66.457 v1(33.655,67.945) ; C3.2 34.418,32.282 35.852,33.716 36.383,33.716 v1(36.449,33.782) ; v1(37.973,33.528) 37.973,32.106 C4.2 ; U3.1 41.281,63.729 v1(44.272,63.729) 44.285,63.741 53.581,63.741 v1(53.594,63.754) 58.744,63.754 U3.40 ; v1(41.656,33.528) 41.656,33.434 41.786,33.304 C6.2 ; v1(43.942,6.223) R12.1 ; v1(44.272,58.42) 45.252,57.44 U3.42 ; v1(45.593,33.528) 45.593,32.214 C7.2 ; R8.2 46.482,38.496 v1(46.482,39.624) ; v1(46.482,10.541) 47.435,9.588 J2.A1_B12 ; U3.44 U3.43 U3.42 ; v1(48.387,59.309) 47.417,58.339 47.417,57.758 U3.42 ; U3.45 U3.41 U3.49 50.242,59.182 v1(50.292,59.182) ; v1@48.895,38.989 v1(48.768,39.116) 50.367,39.116 C11.1 ; v1(49.022,32.258) 49.088,32.192 49.088,32.001 49.669,31.42 U2.4 ; U3.46 U3.47 U3.48 51.322,58.862 51.496,58.862 v1(51.562,58.928) ; U2.15 51.819,32.04 52.07,32.291 v1(52.07,32.385) ; CR1.2 53.848,11.049 v1(54.737,11.938) ; J2.B1_A12 53.835,8.402 53.975,8.542 v1(53.975,8.636) ; C10.1 54.823,32.131 v1(56.896,32.131) ; v1(57.277,5.969) R13.2 ; C8.1 58.53,24.391 59.476,24.391 59.85,24.765 v1(59.944,24.765) ; v1(59.309,32.131) 61.116,32.131 C9.1 ; v1(64.77,54.864) 65.786,55.88 C19.1 67.003,51.001 C18.1 65.405,50.927 v1(64.897,51.435) ; v1(66.106,60.192) 66.2,60.192 66.373,60.365 66.462,60.365 66.545,60.448 67.137,60.448 U4.15 68.33,60.456 U4.17 ; U4.3 68.83,60.456 U4.17 ; R31.2 71.741,65.051 70.698,64.008 68.453,64.008 v1(67.945,63.5) 67.945,63.406 68.33,63.021 U4.11 68.33,60.956 U4.17 ; R18.1 73.233,50.86 73.233,49.289 73.533,48.989 v1(73.533,48.895) ; Q1.2 77.286,51.492 v1(77.724,51.054) ; v1(80.645,47.371) 81.774,47.371 C15.1 ; v1(87.503,52.07) 88.106,52.673 J3.8 ; v1(91.313,46.228) 91.948,46.863 J3.1
  Bottom Layer w0.254: S3.1@16.74,16.229 S3.1@16.767,16.256 ; S2.1@25.49,25.229 S2.1@25.504,25.214
NetC11_2: C11.2 U2.3 | length 5
  Top Layer w0.2: U2.3 50.169,35.962 C11.2
NetC12_2: C12.2 R14.1 SW2.2 U3.3 | length 64.7
  Top Layer w0.5: R14.1 34.152,52.73 34.152,51.7 34.671,51.181 36.576,51.181 37.211,51.816 37.211,56.294 36.591,56.914 C12.2 ; C12.2@36.591,57.414 38.34,59.163 38.481,59.182 v1(38.5,59.201) ; v1(39.627,61.217) 41.247,61.217 U3.3 42.551,61.22 43.053,61.722 53.682,61.722 54.356,61.048 v1(54.356,52.832) ; v1(58.801,41.656) 64.389,36.068 v1(66.04,36.068)
  Bottom Layer w0.5: v1(38.5,59.201) 38.5,60.09 v1(39.627,61.217) ; v1(54.356,52.832) 54.356,50.624 56.642,48.338 56.642,47.227 56.261,46.846 56.261,44.196 v1(58.801,41.656) ; v1(66.04,36.068) 66.142,36.143 SW2.2
NetCR1_1: CR1.1 J2.A6 J2.B6 | length 5.1
  Top Layer w0.2: J2.B6@51.385,7.747 51.385,8.432
  Top Layer w0.3: J2.A6 50.385,8.587 50.561,8.763 51.054,8.763 51.385,8.432 51.953,9 51.953,9.97 52.083,10.099 CR1.1
NetCR1_3: CR1.3 J2.A7 J2.B7 | length 7.9
  Top Layer w0.3: J2.A7@50.885,6.942 50.885,6.797 50.68,6.592 50.061,6.592 49.885,6.768 J2.B7 49.885,9.118 50.927,10.16 50.927,11.303 51.62,11.996 52.29,11.996 CR1.3
NetCR1_4: CR1.4 R16.2 | length 43.9
  Top Layer w0.5: v1@31.642,45.422 33.802,47.582 R16.2 ; v1(49.53,12.954) 49.546,12.938 49.546,12.015 CR1.4
  Bottom Layer w0.5: v1(31.623,45.339) 31.623,33.274 46.482,18.415 46.482,16.002 v1(49.53,12.954)
NetCR1_6: CR1.6 R17.2 | length 40.8
  Top Layer w0.3: v1(33.274,41.402) 33.274,42.736 R17.2 ; CR1.6 49.691,10.228 50.106,10.228 50.401,10.523 v1(50.401,12.72)
  Bottom Layer w0.3: v1(33.274,41.402) 33.274,34.671 50.419,17.526 50.419,14.097 50.401,14.079 v1(50.401,12.72)
NetJ2_A5: J2.A5 R12.2 | length 6.7
  Top Layer w0.3: R12.2 44.149,9.017 v1(46.101,9.017) ; v1(48.768,9.017) 49.385,8.4 J2.A5
  Bottom Layer w0.3: v1(46.101,9.017) v1(48.768,9.017)
NetJ2_B5: J2.B5 R13.1 | length 7
  Top Layer w0.2: J2.B5 52.435,7.567 52.435,9.001 53.086,9.652 56.468,9.652 56.702,9.418 56.702,9.318 57.177,8.843 R13.1
NetJ3_2: J3.2 U3.11 | length 75.1
  Top Layer w0.2: v1(37.118,47.405) 37.118,47.786 40.318,50.986 41.176,50.986 U3.11 ; v1(90.297,48.387) 90.374,48.464 90.374,48.886 91.125,49.638 91.913,49.638 J3.2
  Bottom Layer w0.2: v1(37.118,47.405) 37.084,47.371 37.084,42.799 39.243,40.64 59.476,40.64 62.397,37.719 83.566,37.719 86.487,40.64 86.741,40.64 90.297,44.196 v1(90.297,48.387)
NetJ3_4: J3.4 U3.10 | length 73.8
  Top Layer w0.2: U3.10 41.593,52.33 42.672,53.409 v1(42.672,55.372) ; v1(89.535,57.912) 90.424,58.801 92.71,58.801 93.599,57.912 93.599,51.536 92.771,50.708 91.983,50.708 J3.4
  Bottom Layer w0.2: v1(42.672,55.372) 51.943,64.643 59.817,64.643 63.754,68.58 78.867,68.58 v1(89.535,57.912)
NetJ3_5: J3.5 R24.1 U3.18 | length 51.1
  Top Layer w0.2: U3.18 46.825,45.657 49.048,43.434 81.493,43.434 R24.1@82.409,42.518 ; R24.1 R24.1@82.409,42.518 ; J3.5 91.913,51.138 90.889,51.138 88.265,48.514 88.265,47.371 83.887,42.993 82.884,42.993 R24.1@82.409,42.518
NetJ3_11: J3.11 R23.1 | length 9
  Top Layer w0.2: R23.1 84.187,51.474 84.662,51.949 84.762,51.949 86.986,54.173 J3.11
NetJ3_12: J3.12 R22.1 | length 8
  Top Layer w0.2: R22.1 87.673,55.514 88.514,54.673 J3.12
NetJ3_13: J3.13 R21.1 | length 9.5
  Top Layer w0.2: R21.1 84.328,59.555 84.803,59.08 84.903,59.08 88.81,55.173 J3.13
NetJ3_14: J3.14 R20.1 | length 12.6
  Top Layer w0.2: R20.1 84.187,63.695 86.974,60.907 86.974,58.568 89.869,55.673 J3.14
NetJ4_1: J4.1 R25.2 | length 14.4
  Top Layer w0.5: J4.1 12.545,58.179 13.843,59.477 13.843,66.294 16.469,68.92 17.469,68.92 17.794,69.245 R25.2
NetJ4_2: J4.2 R28.1 U3.22 | length 60.2
  Top Layer w0.5: J4.2 12.22,57.229 13.031,57.229 14.605,58.803 14.605,64.985 14.898,65.278 17.399,65.278 17.545,65.132 17.545,63.265 v1(17.526,63.246) ; v1(51.569,47.745) 51.569,47.718 51.905,47.382 U3.22
  Bottom Layer w0.5: v1(17.526,63.246) 21.094,59.678 21.774,59.678 26.842,54.61 50.292,54.61 51.689,53.213 51.689,49.045 51.569,48.925 v1(51.569,47.745)
NetJ4_8: J4.8 R26.2 | length 7.5
  Top Layer w0.5: J4.8 12.17,50.379 12.881,50.379 16.834,46.426 16.834,45.791 R26.2
NetJ5_1: J5.1 U4.9 | length 6.6
  Top Layer w0.2: U4.9 69.33,61.926 69.365,61.891 71.738,61.891 72.415,61.214 J5.1
NetJ5_2: J5.2 U4.10 | length 7.3
  Top Layer w0.2: U4.10 68.865,62.176 68.865,62.635 69.443,63.214 J5.2
NetL1_1: L1.1 U2.11 | length 4.9
  Top Layer w0.2: U2.11 50.919,28.774 51.689,28.004 L1.1
NetL1_2: L1.2 U2.9 | length 4.8
  Top Layer w0.2: L1.2 49.319,28.174 49.919,28.774 U2.9
NetQ1_1: Q1.1 R18.2 R19.2 | length 6.2
  Top Layer w0.5: R18.2 74.598,51.371 74.598,54.546 R19.2 76.712,54.61 Q1.1
NetQ1_3: Q1.3 R20.2 R21.2 R22.2 R23.2 | length 17.3
  Top Layer w0.5: Q1.3 80.725,53.086 81.407,52.404 ; R23.2 81.407,52.404 ; R20.2 82.437,63.695 82.112,63.37 82.012,63.37 81.407,62.765 81.407,60.826 R21.2 81.407,58.484 81.407,56.685 R22.2 81.407,54.343 81.407,52.404
NetR2_2: R2.2 U1.6 U3.34 | length 62.9
  Top Layer w0.2: U1.6 16.062,35.979 17.272,37.189 R2.2 ; v1(52.705,49.784) 56.734,53.813 56.734,54.467 58.407,56.14 U3.34
  Top Layer w0.5: v1(15.621,38.735) 15.648,38.735 15.761,38.622 R2.2
  Bottom Layer w0.5: v1(15.621,38.735) 15.621,42.291 23.241,49.911 41.062,49.911 44.479,46.494 51.378,46.494 52.705,47.821 v1(52.705,49.784)
NetR3_2: R3.2 U1.5 U3.25 | length 49.3
  Top Layer w0.2: U1.5 16.562,35.021 18.751,37.211 20.079,37.211 21.49,38.622 R3.2
  Top Layer w0.5: R3.2 23.636,38.622 v1(30.099,45.085) ; v1(54.864,47.498) 54.864,47.471 55.559,46.776 55.559,46.499 55.715,46.343 U3.25
  Bottom Layer w0.5: v1(30.099,45.085) 30.099,46.99 31.623,48.514 38.1,48.514 41.148,45.466 52.197,45.466 53.267,46.536 53.988,46.536 54.28,46.829 54.28,46.887 54.864,47.471 v1(54.864,47.498)
NetR4_1: R4.1 U1.12 | length 10.2
  Top Layer w0.2: R4.1 7.085,32.526 9.893,29.718 12.446,29.718 14.337,31.609 U1.12
NetR5_1: R5.1 U1.1 | length 5.5
  Top Layer w0.2: R5.1 17.272,32.497 U1.1
NetR6_1: R6.1 U1.16 | length 6.1
  Top Layer w0.2: R6.1 13.816,26.91 16.562,29.656 U1.16
NetR7_1: R7.1 R8.1 U2.5 | length 11.5
  Top Layer w0.2: R8.1 47.498,35.614 47.498,32.17 48.844,30.824 U2.5
  Top Layer w0.5: R7.1 43.002,38.113 43.899,38.113 44.999,37.013 46.099,37.013 R8.1
NetR9_2: R9.2 S1.1 U3.8 | length 61.7
  Top Layer w0.5: S1.1 2.761,44.276 6.637,44.276 R9.2 6.831,44.182 7.156,44.507 7.156,44.607 9.525,46.976 v1(9.525,63.119) ; v1(38.862,55.499) 38.889,55.499 39.518,54.87 U3.8
  Bottom Layer w0.5: v1(9.525,63.119) 10.402,63.996 17.088,63.996 17.108,64.015 17.729,64.015 17.748,63.996 32.905,63.996 36.195,60.706 36.195,58.166 v1(38.862,55.499)
NetR10_2: R10.2 U2.14 | length 9.9
  Top Layer w0.2: U2.14 51.844,30.349 52.164,30.349 52.967,31.152 52.967,33.536 55.771,36.34 57.188,36.34 R10.2
NetR11_2: R11.2 U2.1 | length 6.8
  Top Layer w0.2: U2.1 51.169,34.181 53.817,36.829 R11.2
NetR15_1: R15.1 SW1.1 U3.27 | length 16.9
  Top Layer w0.5: U3.27 61.538,47.25 R15.1@61.863,46.925 ; R15.1 R15.1@61.863,46.925 ; v1(65.278,48.768) 63.632,48.768 62.542,47.678 62.542,47.642 61.863,46.963 R15.1@61.863,46.925
  Bottom Layer w0.5: v1(65.278,48.768) 70.651,48.768 SW1.1
NetR16_1: R16.1 U3.13 | length 7.3
  Top Layer w0.4: R16.1 35.552,47.582 36.922,46.211 38.21,46.211 40.519,48.52 U3.13
NetR17_1: R17.1 U3.14 | length 7.6
  Top Layer w0.4: R17.1 36.294,43.053 40.491,47.25 U3.14
NetR19_1: R19.1 U3.23 | length 26.1
  Top Layer w0.2: U3.23 53.175,45.657 54.001,44.831 65.855,44.831 70.927,49.903 70.927,52.525 72.912,54.51 R19.1
NetR30_1: R30.1 U4.4 | length 17.7
  Top Layer w0.2: v1(61.468,58.928) 62.99,60.45 62.99,63.257 64.911,65.178 R30.1 ; v1(65.659,57.369) 67.887,57.369 69.295,58.777 69.295,59.236 U4.4
  Bottom Layer w0.2: v1(61.468,58.928) 61.468,58.42 62.611,57.277 64.035,57.277 64.127,57.369 v1(65.659,57.369)
NetR30_2: R30.2 R31.1 U3.36 | length 18.3
  Top Layer w0.3: U3.36 59.006,58.936 59.387,58.936 61.918,61.467 61.918,66.109 62.738,66.929 65.405,66.929 66.236,66.098 66.236,65.703 R30.2 66.788,65.151 R31.1
NetR32_1: R32.1 S2.2 U3.6 | length 100.3
  Top Layer w0.2: R32.1 v1(9.906,21.336)
  Top Layer w0.5: v1(4.826,26.924) 8.622,23.128 R32.1 ; U3.6 41.253,57.407 42.542,57.407 v1(42.545,57.404)
  Bottom Layer w0.2: v1(9.906,21.336) 16.637,21.336 20.161,24.86 S2.2@20.504,24.86
  Bottom Layer w0.5: v1(4.826,26.924) 4.826,43.216 8.382,46.772 8.382,64.262 10.287,66.167 35.732,66.167 39.932,61.967 39.938,61.967 40.377,61.528 40.377,61.522 42.545,59.354 v1(42.545,57.404)
NetR33_1: R33.1 S3.2 U3.4 | length 68.3
  Top Layer w0.3: R33.1 9.607,16.637 v1(10.115,16.129)
  Top Layer w0.5: v1(24.257,43.815) 29.464,49.022 29.464,58.381 29.757,58.674 v1(30.48,58.674) ; v1(35.052,58.928) 36.074,59.95 38.188,59.95 38.19,59.951 38.811,59.951 38.812,59.95 U3.4
  Bottom Layer w0.3: v1@10.241,16.129 10.511,15.86 S3.2@11.754,15.86
  Bottom Layer w0.5: v1@10.16,16.129 8.382,17.907 8.382,29.21 22.098,42.926 23.368,42.926 v1(24.257,43.815) ; v1(30.48,58.674) 34.771,58.674 35.025,58.928 v1(35.052,58.928)
NetR34_1: R34.1 S4.2 U3.39 | length 67.9
  Top Layer w0.3: U3.39 58.753,62.487 60.195,62.487 v1(60.198,62.484) ; v1(70.993,41.529) 73.787,41.529 75.184,40.132 78.081,40.132 94.121,24.092 R34.1 94.121,20.474 91.059,17.412 v1(91.059,16.383)
  Bottom Layer w0.3: v1(60.198,62.484) 60.706,61.976 60.706,51.943 70.739,41.91 70.739,41.864 70.993,41.61 v1(70.993,41.529) ; v1(91.059,16.383) 91.98,16.383 S4.2@92.504,15.86
NetR35_1: R35.1 S5.2 U3.35 | length 48.1
  Top Layer w0.3: v1(56.515,57.277) 57.419,57.277 57.476,57.334 58.674,57.334 U3.35 ; v1(67.056,41.402) 67.056,38.735 68.326,37.465 74.282,37.465 80.659,31.088 R35.1 80.659,30.888 78.162,28.391 78.162,27.743 v1(78.105,27.686)
  Bottom Layer w0.3: v1(56.515,57.277) 56.515,51.943 v1(67.056,41.402) ; v1(78.105,27.686) 78.162,27.629 78.162,27.201 S5.2@79.004,26.36
NetR36_1: R36.1 S6.2 U3.12 | length 37.3
  Top Layer w0.3: v1(38.862,18.923) 38.862,20.588 R36.1
  Top Layer w0.4: v1(37.973,47.244) 38.03,47.301 38.03,47.555 40.265,49.79 U3.12 ; R36.1 38.975,20.801 39.751,21.577 v1(39.751,43.409)
  Bottom Layer w0.3: v1(38.862,18.923) 38.862,16.752 S6.2@39.754,15.86
  Bottom Layer w0.4: v1(37.973,47.244) 39.37,45.847 39.37,43.79 v1(39.751,43.409)
NetR37_1: R37.1 S7.2 U3.7 | length 106.6
  Top Layer w0.3: R37.1 8.368,11.33 9.735,9.963 v1(10.103,9.963)
  Top Layer w0.4: R37.1 8.368,11.566 7.379,12.555 6.749,12.555 1.016,18.288 1.016,35.941 1.651,36.576 5.588,36.576 9.739,40.727 9.965,40.727 12.545,43.307 21.417,43.307 21.599,43.489 21.599,55.381 v1(31.115,64.897) ; v1(39.624,56.769) 39.651,56.769 40.28,56.14 U3.7
  Bottom Layer w0.3: v1(10.103,9.963) 12.956,7.11 S7.2@20.504,7.11
  Bottom Layer w0.4: v1(31.115,64.897) 34.671,64.897 37.519,62.049 37.519,58.874 v1(39.624,56.769)
NetR38_1: R38.1 S8.2 U3.5 | length 57.5
  Top Layer w0.4: v1(26.035,44.069) 32.385,50.419 37.084,50.419 37.973,51.308 37.973,57.404 39.249,58.68 U3.5 ; v1(29.845,34.553) 29.845,22.239 R38.1
  Top Layer w0.5: v1(28.378,17.088) 28.321,17.145 28.378,17.202 28.378,17.596 31.383,20.601 R38.1
  Bottom Layer w0.4: v1(26.035,44.069) 26.035,38.363 v1(29.845,34.553)
  Bottom Layer w0.5: v1(28.378,17.088) 28.378,16.199 28.717,15.86 S8.2@29.504,15.86
NetR39_1: R39.1 S9.2 U3.38 | length 80.4
  Top Layer w0.3: v1(57.15,61.087) 57.207,61.144 58.674,61.144 U3.38 ; v1(69.215,41.402) 72.517,38.1 78.359,38.1 90.17,26.289 90.17,20.307 82.409,12.546 R39.1 82.409,12.346 77.851,7.788 v1(77.851,5.969)
  Bottom Layer w0.3: v1(57.15,61.087) 57.15,57.899 57.226,57.822 57.226,54.716 67.529,44.413 67.529,43.088 v1(69.215,41.402) ; v1(77.851,5.969) 78.46,5.36 S9.2@79.004,5.36
NetR40_1: R40.1 S10.2 U3.24 | length 47.9
  Top Layer w0.3: U3.24 54.189,46.256 54.189,47 53.706,47.483 53.706,48.021 54.014,48.33 v1(54.68,48.33) ; v1(55.118,42.037) 57.404,42.037 65.532,33.909 65.532,30.099 69.116,26.515 R40.1 67.31,21.336 64.262,18.288 v1(64.262,16.51)
  Bottom Layer w0.3: v1(54.68,48.33) 54.737,48.272 55.275,48.272 55.78,47.767 55.78,47.229 55.768,47.217 55.768,47.202 55.387,46.821 55.372,46.821 55.118,46.567 v1(55.118,42.037) ; v1(64.262,16.51) 64.343,16.51 64.711,16.142 S10.2@65.504,16.142
NetR41_1: R41.1 S11.2 U3.17 | length 51.3
  Top Layer w0.3: U3.17 45.811,45.744 45.811,45.363 49.891,41.283 56.888,41.283 60.512,37.659 60.512,35.246 64.262,31.496 R41.1 64.262,21.236 62.702,19.677 55.745,19.677 53.848,17.78 v1(53.848,16.637)
  Bottom Layer w0.3: v1(53.848,16.637) 54.625,15.86 S11.2@55.254,15.86
NetU3_31: U3.31 U4.16 | length 11.6
  Top Layer w0.2: U3.31 59.093,52.33 66.684,59.921 67.11,59.921 U4.16
NetU3_32: U3.32 U4.14 | length 11.7
  Top Layer w0.2: U3.32 59.093,53.6 65.506,60.013 65.506,60.44 65.858,60.792 66.285,60.792 66.425,60.932 67.121,60.932 U4.14
NetU3_33: U3.33 U4.1 | length 11.1
  Top Layer w0.2: U3.33 59.093,54.87 62.693,58.47 62.915,58.47 v1(62.992,58.547) ; v1(66.675,58.547) 67.113,58.985 67.795,58.985 67.83,59.02 U4.1
  Bottom Layer w0.2: v1(62.992,58.547) v1(66.675,58.547)
SPI_MISO: J3.7 J4.7 R27.1 U3.21 | length 94.3
  Top Layer w0.2: U3.21 50.635,45.657 51.861,44.431 83.708,44.431 87.249,47.972 87.249,49.38 90.007,52.138 91.913,52.138 J3.7
  Top Layer w0.5: J4.7 14.67,51.579 14.675,51.574 15.003,51.574 17.032,49.545 R27.1 17.357,49.77 17.357,50.731 v1(17.653,51.027) ; v1(50.419,47.498) 50.479,47.411 50.479,46.156 U3.21
  Bottom Layer w0.5: v1(17.653,51.027) 17.653,51.054 20.066,53.467 48.768,53.467 50.419,51.816 v1(50.419,47.498)
SPI_MOSI: J3.6 J4.3 R29.1 U3.19 | length 103.8
  Top Layer w0.2: U3.19 48.095,45.657 49.81,43.942 83.947,43.942 87.757,47.752 87.757,49.323 90.073,51.638 91.913,51.638 J3.6
  Top Layer w0.5: J4.3 12.22,56.129 13.031,56.129 13.843,56.941 ; v1(13.843,55.753) 13.843,56.941 ; R29.1 16.425,61.383 15.494,60.452 15.494,58.592 13.843,56.941 ; U3.19 48.133,46.038 v1(48.133,47.244)
  Bottom Layer w0.5: v1(13.843,55.753) 13.843,49.911 15.748,48.006 19.05,48.006 21.844,50.8 44.577,50.8 v1(48.133,47.244)
SPI_SCK: J3.3 J4.5 U3.20 | length 97.3
  Top Layer w0.2: U3.20 49.365,45.657 50.177,44.845 v1(50.177,44.657) ; v1(52.197,42.291) 52.578,42.672 74.295,42.672 75.946,41.021 83.82,41.021 88.9,46.101 88.9,48.26 90.778,50.138 91.913,50.138 J3.3
  Top Layer w0.5: J4.5 12.22,53.629 13.681,53.629 v1(14.986,52.324) ; v1(49.276,47.244) 49.295,47.225 49.295,46.07 U3.20
  Bottom Layer w0.2: v1(50.177,44.657) 50.253,44.58 50.253,44.472 50.576,44.15 50.576,43.912 v1(52.197,42.291)
  Bottom Layer w0.5: v1(14.986,52.324) 14.986,50.546 15.875,49.657 18.034,49.657 20.574,52.197 48.514,52.197 49.276,51.435 v1(49.276,47.244)
USB_POWER_GOOD_N: R1.2 U1.7 U3.9 | length 39.5
  Top Layer w0.2: R1.2 13.308,38.636 15.561,36.383 U1.7
  Top Layer w0.5: R1.2 13.533,38.961 13.815,38.961 17.145,42.291 25.781,42.291 33.147,49.657 37.312,49.657 37.436,49.781 37.498,49.781 38.611,50.894 38.611,50.956 38.844,51.189 38.844,51.716 40.314,53.186 40.493,53.186 40.907,53.6 U3.9
VBAT: C5.2 J1.1 U1.2 U1.3
VBUS_V5: C1.1 CR1.5 J2.A4_B9 J2.B4_A9 U1.13
VSYS: C2.2 C8.2 C9.2 C10.2 R10.1 R11.1 U1.10 U1.11 U2.12-13 | length 50.1
  Top Layer w0.2: C2.2 10.918,31.697 12.232,33.011 U1.11 U1.10
  Top Layer w0.5: C2.2 12.245,31.697 v1(12.7,31.242) ; v1(31.877,28.956) 31.877,32.177 36.53,36.83 v1(38.354,36.83)
  Bottom Layer w0.5: v1(12.7,31.242) 14.986,28.956 v1(31.877,28.956) ; v1(38.354,36.83) 46.228,36.83 v1(48.768,34.29)
pads on no net: J2. J2.A8 J2.B8 J3.15 J3.16 J3.17 J3.18 J3.19 J3.20 J4.SW-A J4.SW-B S1.3 SW1.2 SW1.3 SW2.1 SW2.4 U1.9 U1.14 U1.15 U2.2 U2.6 U3.15 U3.16 U3.26 U3.28 U3.29 U3.30 U3.37 U4.2 U4.5 U4.6 U4.12 U4.13

## Polygon pours and split planes (outlines as drawn)
+3V3 on Top Layer "+3V3_L01_P010" (solid, remove dead copper, pour order 10): 0,3.041 0,69.041 cw(c3,69.041) 3,72.041 97,72.041 cw(c97,69.041) 100,69.041 100,3.041 cw(c97,3.041) 97,0.041 3,0.041 cw(c3,3.041)
VBUS_V5 on Top Layer "NONET_L-01_P-001" (solid, remove dead copper, pour order 9): 59.69,10.16 59.69,4.064 28.321,4.064 0.889,31.496 1.016,31.623 1.016,33.782 15.291,33.782 30.531,18.542 51.181,18.542 59.563,10.16
VSYS on Top Layer "NONET_L-01_P-001" (solid, remove dead copper, pour order 8): 52.578,40.259 52.832,40.005 61.595,40.005 64.262,37.338 64.262,25.781 60.96,22.479 45.085,23.956 45.085,32.258 43.713,33.63 43.713,35.814 52.578,38.276
VBAT on Top Layer "NONET_L-01_P-001" (solid, remove dead copper, pour order 7): 16.891,33.782 16.891,33.401 16.891,32.131 17.272,32.131 18.796,30.607 28.321,30.607 28.321,33.02 27.813,33.528
GND on Bottom Layer "GND_L02_P005" (solid, remove dead copper, pour order 5): 0.064,3.362 0.064,69.362 cw(c3.064,69.362) 3.064,72.362 97.064,72.362 cw(c97.064,69.362) 100.064,69.362 100.064,3.362 cw(c97.064,3.362) 97.064,0.362 3.064,0.362 cw(c3.064,3.362)

## Keep-outs
Top Layer:
  circle w2.85: c23,25 r1.425
  circle w2.85: c57.75,16 r1.425
  circle w2.85: c68,16 r1.425
  circle w2.85: c81.5,5.5 r1.425
  circle w2.85: c32,16 r1.425
  circle w2.85: c23,7.25 r1.425
  circle w2.85: c42.25,16 r1.425
  circle w2.85: c81.5,26.5 r1.425
  circle w2.85: c95,16 r1.425
  circle w2.85: c14.25,16 r1.425

## Silkscreen, mask and mechanical layers (free items; w line width, h text height)
Top Overlay:
  lines w0.013: -6391.033,-47.765 ccw(c-5488.255,1916.073) -6391.001,-47.78 ; -42.776,-47.873 cw(c3474.709,-43.472) -42.776,-47.845 ; 4518.294,-47.816 ccw(c5084.386,1183.527) 4518.314,-47.825 ; 4518.393,-47.861 cw(c3944.355,-1296.634) 4518.418,-47.873
Bottom Overlay:
  drawing of 36 lines, arcs and shapes, not listed
  text "G.E.M.A.S" at 1.643,11.686 h1.52 r270
  text "Made in Mexico by MAGS" at 43.18,1.524 h1.52
Bottom Solder:
  drawing of 50 lines, arcs and shapes, not listed
Mechanical 1:
  lines w0.013: -42.776,-47.873 cw(c3474.709,-43.472) -42.776,-47.845
  lines w0.254: 0,3.041 ccw(c3,3.041) 3,0.041 97,0.041 ccw(c97,3.041) 100,3.041 100,69.041 ccw(c97,69.041) 97,72.041 3,72.041 ccw(c3,69.041) 0,69.041 0,3.041

## Text inside footprints (layer, text, board x,y; h text height)
CR1: Mechanical 13 "*" at 51.74,10.871 h1.27 r180
J2: Mechanical 13 "PCB EDGE" at 56.035,0.262 h0.41
S1: Mechanical 13 "*" at 0.876,43.735 h1.27
U1: Mechanical 13 "*" at 16.925,32.896 h1.27 r180
U3: Top Overlay "*" at 38.227,63.127 h1.27; Mechanical 13 "*" at 42.317,63.125 h1.27